# Altium PCB John_Main.PcbDoc (part 2 of 5)
Units mil, origin at the board's own origin, x right, y up, seen from the top; angles counter-clockwise.
Board outline 3346 x 2756 mil, 2 copper layers (Top Layer, Bottom Layer), stack 57 mil thick; 275 components, 161 nets, 721 pads, 398 vias.
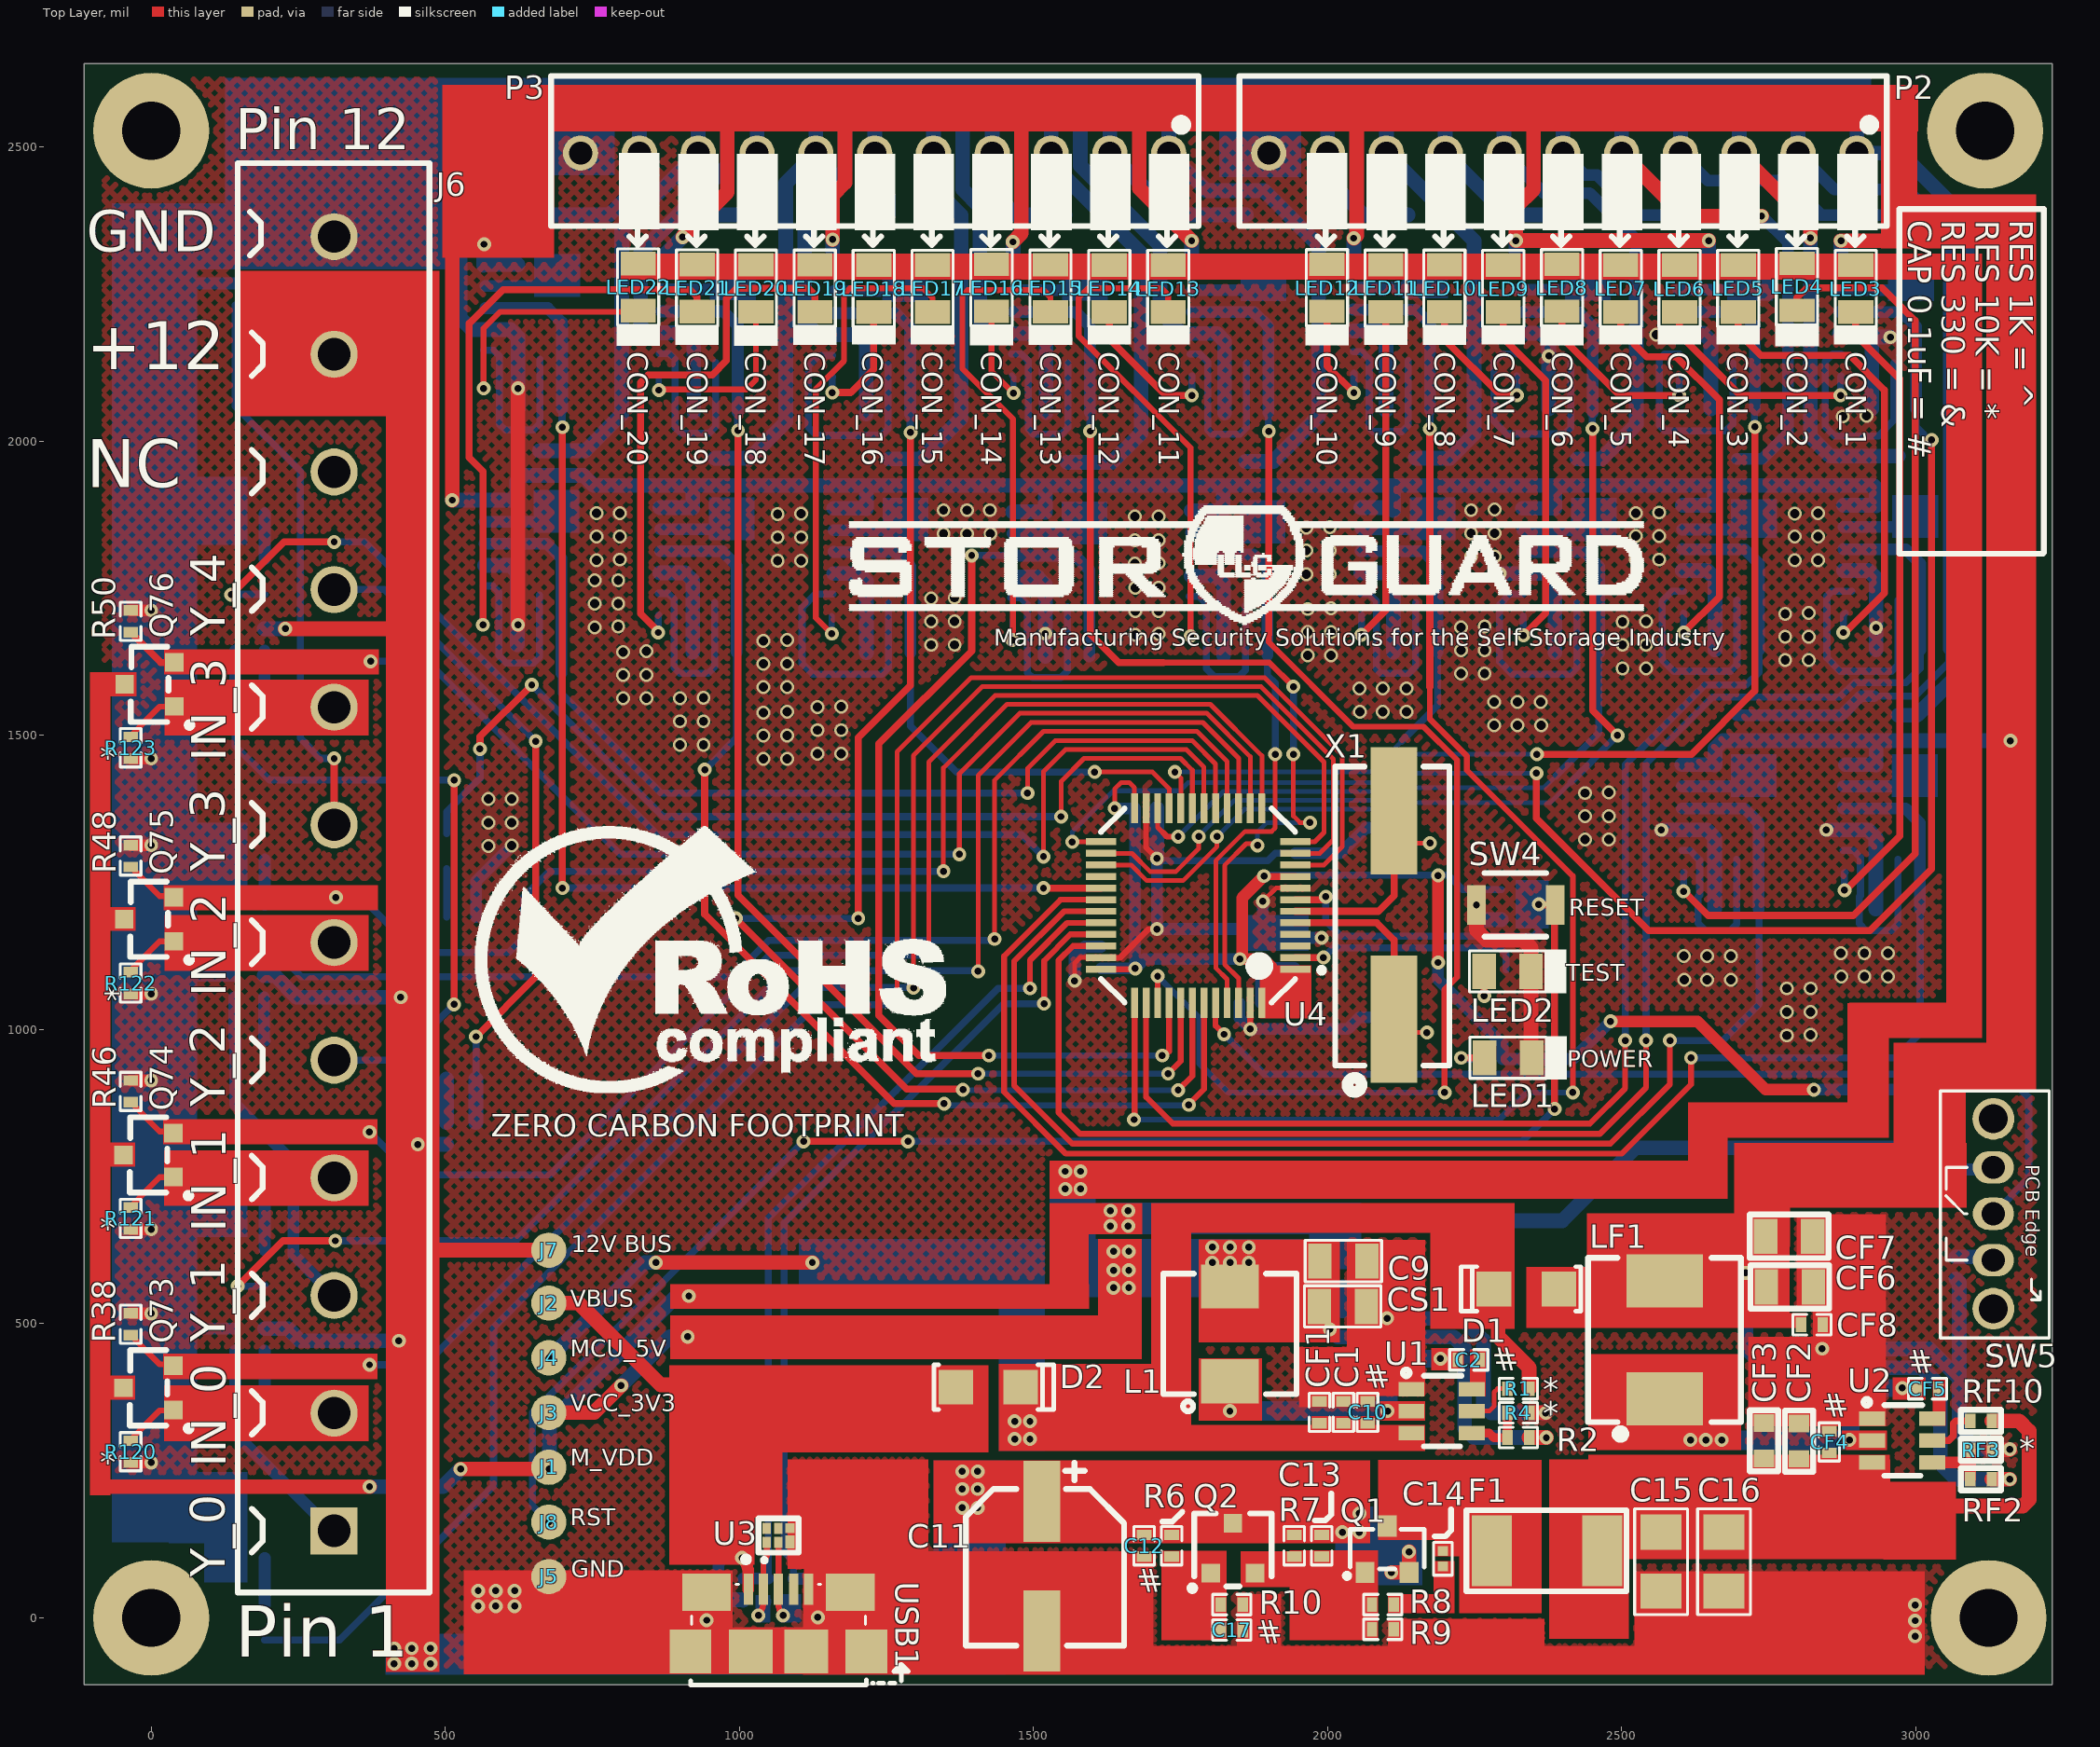
[diagram p0: Top Layer view]

## Part data (continued)
LED1: "LED GREEN CLEAR CHIP 0603 SMD", Case/Package=0603, Case Code (Metric)=1608, Color=Green, Forward Current=30mA, Forward Voltage=2V, Lens Color=Colorless, MANUFACTURER="Vishay Lite-On", Max Operating Temperature=85°C, Min Operating Temperature=-55°C, Package Quantity=1, Power Dissipation=75mW, Reverse Voltage=5V, Supplier Part Number 1=160-1435-6-ND, Test Current=20mA, Case Code (Imperial)=0603, ComponentLink1Description=https://www.verical.com/server-webapp/html/getDatasheet?partID=141494&src-supplier=Verical, ComponentLink1URL=https://www.verical.com/server-webapp/html/getDatasheet?partID=141494&src-supplier=Verical, ComponentLink2Description=http://optoelectronics.liteon.com/upload/download/DS22-2000-074/LTST-C190KGKT.PDF?src-supplier=Digi-Key, ComponentLink2URL=http://optoelectronics.liteon.com/upload/download/DS22-2000-074/LTST-C190KGKT.PDF?src-supplier=Digi-Key, ComponentLink3Description=http://www.mouser.com/ds/2/239/LTST-C190KGKT-1141861.pdf?src-supplier=Mouser, ComponentLink3URL=http://www.mouser.com/ds/2/239/LTST-C190KGKT-1141861.pdf?src-supplier=Mouser, ComponentLink4Description=http://uk.rs-online.com/webdocs/0dc0/0900766b80dc02a8.pdf?src-supplier=RSComponents, ComponentLink4URL=http://uk.rs-online.com/webdocs/0dc0/0900766b80dc02a8.pdf?src-supplier=RSComponents, Depth=0.8mm, Dominant Wavelength=571nm, Height=0.8mm, Illumination Color=Green, Lead Free="Lead Free", Length=1.6mm, Lens Style=Diffused,Colorless,Rectangular,Clear, Lens Transparency=Clear, Luminous Intensity=35mcd, Manufacturer Part Number=LTST-C190KGKT, Mount="Surface Mount", Number of Elements=1, Number of LEDs=1, Number of Pins=2, Packaging="Tape and Reel", Power Rating=75mW, Pricing 1="1=0.26, 10=0.188, 25=0.138, 100=0.0987, 250=0.06712, 500=0.05922, 1000=0.04639 (USD)", Radiation Hardening=No, Stock 1=1327387, Supplier 1=Digi-Key, Viewing Angle=130°, Wavelength=574nm, Width=0.8mm
LED2 LED3 LED4 LED5 LED6 LED7 LED8 LED9 LED10 LED11 LED12 LED13 LED14 LED15 LED16 LED17 LED18 LED19 LED20 LED21 LED22: "LED GREEN CLEAR CHIP SMD", Case/Package=0603, Case Code (Metric)=1608, Color=Green, Forward Current=30mA, Forward Voltage=2V, Lens Color=Colorless, MANUFACTURER="Vishay Lite-On", Max Operating Temperature=85°C, Min Operating Temperature=-55°C, Package Quantity=1, Power Dissipation=75mW, Reverse Voltage=5V, Supplier Part Number 1=160-1435-6-ND, Test Current=20mA, Case Code (Imperial)=0603, ComponentLink1Description=https://www.verical.com/server-webapp/html/getDatasheet?partID=141494&src-supplier=Verical, ComponentLink1URL=https://www.verical.com/server-webapp/html/getDatasheet?partID=141494&src-supplier=Verical, ComponentLink2Description=http://optoelectronics.liteon.com/upload/download/DS22-2000-074/LTST-C190KGKT.PDF?src-supplier=Digi-Key, ComponentLink2URL=http://optoelectronics.liteon.com/upload/download/DS22-2000-074/LTST-C190KGKT.PDF?src-supplier=Digi-Key, ComponentLink3Description=http://www.mouser.com/ds/2/239/LTST-C190KGKT-1141861.pdf?src-supplier=Mouser, ComponentLink3URL=http://www.mouser.com/ds/2/239/LTST-C190KGKT-1141861.pdf?src-supplier=Mouser, ComponentLink4Description=http://uk.rs-online.com/webdocs/0dc0/0900766b80dc02a8.pdf?src-supplier=RSComponents, ComponentLink4URL=http://uk.rs-online.com/webdocs/0dc0/0900766b80dc02a8.pdf?src-supplier=RSComponents, Depth=0.8mm, Dominant Wavelength=571nm, Height=0.8mm, Illumination Color=Green, Lead Free="Lead Free", Length=1.6mm, Lens Style=Diffused,Colorless,Rectangular,Clear, Lens Transparency=Clear, Luminous Intensity=35mcd, Manufacturer Part Number=LTST-C190KGKT, Mount="Surface Mount", Number of Elements=1, Number of LEDs=1, Number of Pins=2, Packaging="Tape and Reel", Power Rating=75mW, Pricing 1="1=0.26, 10=0.188, 25=0.138, 100=0.0987, 250=0.06712, 500=0.05922, 1000=0.04639 (USD)", Radiation Hardening=No, Stock 1=1327387, Supplier 1=Digi-Key, Viewing Angle=130°, Wavelength=574nm, Width=0.8mm
LF1: "FIXED IND 3.3UH 6A 30 MOHM SMD", Case/Package=Nonstandard, Current Rating=6A, DC Resistance (DCR)=30mR, Inductance=3.3uH, Inductance Tolerance=20%, MANUFACTURER="Eaton Cooper", Max DC Current=13.5A, Max Operating Temperature=125°C, Min Operating Temperature=-55°C, Package Quantity=1500, Self Resonant Frequency=5MHz, Supplier Part Number 1=513-1704-6-ND, Test Frequency=100kHz, ComponentLink1Description=http://uk.rs-online.com/webdocs/116a/0900766b8116a344.pdf?src-supplier=RSComponents, ComponentLink1URL=http://uk.rs-online.com/webdocs/116a/0900766b8116a344.pdf?src-supplier=RSComponents, ComponentLink2Description=http://www.cooperbussmann.com/pdf/b1c6e5a7-68ac-495d-bbf3-15e0507f2816.pdf?src-supplier=Future+Electronics, ComponentLink2URL=http://www.cooperbussmann.com/pdf/b1c6e5a7-68ac-495d-bbf3-15e0507f2816.pdf?src-supplier=Future+Electronics, ComponentLink3Description=http://www.farnell.com/datasheets/1508418.pdf?src-supplier=Element14, ComponentLink3URL=http://www.farnell.com/datasheets/1508418.pdf?src-supplier=Element14, ComponentLink4Description=http://www.cooperindustries.com/content/dam/public/bussmann/Electronics/Resources/product-datasheets/Bus_Elx_DS_4085_HCM0703_Series.pdf?src-supplier=Onlinecomponents.com, ComponentLink4URL=http://www.cooperindustries.com/content/dam/public/bussmann/Electronics/Resources/product-datasheets/Bus_Elx_DS_4085_HCM0703_Series.pdf?src-supplier=Onlinecomponents.com, ComponentLink5Description=http://www.cooperbussmann.com/pdf/b1c6e5a7-68ac-495d-bbf3-15e0507f2816.pdf?src-supplier=Element14, ComponentLink5URL=http://www.cooperbussmann.com/pdf/b1c6e5a7-68ac-495d-bbf3-15e0507f2816.pdf?src-supplier=Element14, Composition=Wirewound, Core Material=Ferrite,Composite, DC Current=6A, Depth=7mm, Height=3mm, Height - Seated (Max)=0.118inch, Lead Free="Lead Free", Length=7.4mm, Manufacturer Part Number=HCM0703-3R3-R, Military Standard=Not, Mount="Surface Mount", Number of Pins=2, Packaging="Tape and Reel", Pricing 1="1=2.49, 10=2.298, 100=1.6084, 500=1.30204 (USD)", Radiation Hardening=No, REACH SVHC="No SVHC", RMS Current (Irms)=6A, Saturation Current=13.5A, Shielding=Shielded, Stock 1=3231, Supplier 1=Digi-Key, Termination=SMD/SMT, Tolerance=20%, Weight=0.016oz, Width=0.26inch
P2 P3: "CONN HEADER VERT 11POS 2.54MM", Contact Resistance=10mR, Housing Color=White, MANUFACTURER=Molex, Max Operating Temperature=75°C, Min Operating Temperature=0°C, Supplier Part Number 1=23-0022232111-ND, ComponentLink1Description=http://components.arrow.com/part/dataview/4703620S3674830N3303?src-supplier=Arrow, ComponentLink1URL=http://components.arrow.com/part/dataview/4703620S3674830N3303?src-supplier=Arrow, Contact Material=Brass, Contact Plating=Copper,Tin, Depth=6.35mm, Gender=Male, Housing Material=Nylon, Length=27.94mm, Manufacturer Part Number=0022232111, Number of Contacts=11, Number of Rows=1, Orientation=Straight, Packaging=Bag, Pitch=2.54mm, Pricing 1="1=0.74, 10=0.652, 100=0.5628, 500=0.46046, 1000=0.4093, 5000=0.35813, 10000=0.34023 (USD)", Stock 1=1529, Supplier 1=Digi-Key, Termination=Solder
Q1: "P-Channel 30V Fast Switching MOSFET", MANUFACTURER="TY Semiconductor", Package/Case=SOT23, ComponentLink1Description=https://datasheet.ciiva.com/22641/1596366-22641636.pdf, ComponentLink1URL=https://datasheet.ciiva.com/22641/1596366-22641636.pdf, ComponentLink2Description=https://datasheet.ciiva.com/1190/1596366-1190137.pdf, ComponentLink2URL=https://datasheet.ciiva.com/1190/1596366-1190137.pdf, ComponentLink3Description=https://datasheet.ciiva.com/15198/getdatasheetpartid-110266-15198908.pdf, ComponentLink3URL=https://datasheet.ciiva.com/15198/getdatasheetpartid-110266-15198908.pdf, ComponentLink4Description=https://datasheet.ciiva.com/8115/bss138lt1-d-8115295.pdf, ComponentLink4URL=https://datasheet.ciiva.com/8115/bss138lt1-d-8115295.pdf, ComponentLink5Description=https://datasheet.ciiva.com/8115/bss138lt1-d-8115358.pdf, ComponentLink5URL=https://datasheet.ciiva.com/8115/bss138lt1-d-8115358.pdf, ComponentLink6Description=https://datasheet.ciiva.com/1190/1596366-1190136.pdf, ComponentLink6URL=https://datasheet.ciiva.com/1190/1596366-1190136.pdf, ComponentLink7Description=https://datasheet.ciiva.com/936/bss138lt1-d-936802.pdf, ComponentLink7URL=https://datasheet.ciiva.com/936/bss138lt1-d-936802.pdf, ComponentLink8Description=https://datasheet.ciiva.com/936/bss138lt1-d-936801.pdf, ComponentLink8URL=https://datasheet.ciiva.com/936/bss138lt1-d-936801.pdf, ComponentLink9Description=https://datasheet.ciiva.com/14553/70099493-14553829.pdf, ComponentLink9URL=https://datasheet.ciiva.com/14553/70099493-14553829.pdf, ComponentLink10Description=https://datasheet.ciiva.com/936/bss138lt1-d-936803.pdf, ComponentLink10URL=https://datasheet.ciiva.com/936/bss138lt1-d-936803.pdf, Manufacturer Part No.=QM3001K
Q2: "NPN Resistor-Equiped Transistor", Case/Package=SOT-23-3, Continuous Drain Current (ID)=200mA, Drain to Source Breakdown Voltage=50V, Drain to Source Resistance=3.5R, Gate to Source Voltage (Vgs)=20V, Input Capacitance=50pF, MANUFACTURER="ON Semiconductor", Max Operating Temperature=150°C, Max Power Dissipation=225mW, Min Operating Temperature=-55°C, Package Quantity=1, Supplier Part Number 1=BSS138LT1GOSDKR-ND, Threshold Voltage=1.5V, ComponentLink1Description=https://datasheet.ciiva.com/22641/1596366-22641636.pdf, ComponentLink1URL=https://datasheet.ciiva.com/22641/1596366-22641636.pdf, ComponentLink2Description=https://datasheet.ciiva.com/1190/1596366-1190137.pdf, ComponentLink2URL=https://datasheet.ciiva.com/1190/1596366-1190137.pdf, ComponentLink3Description=https://datasheet.ciiva.com/15198/getdatasheetpartid-110266-15198908.pdf, ComponentLink3URL=https://datasheet.ciiva.com/15198/getdatasheetpartid-110266-15198908.pdf, ComponentLink4Description=https://datasheet.ciiva.com/8115/bss138lt1-d-8115295.pdf, ComponentLink4URL=https://datasheet.ciiva.com/8115/bss138lt1-d-8115295.pdf, ComponentLink5Description=https://datasheet.ciiva.com/8115/bss138lt1-d-8115358.pdf, ComponentLink5URL=https://datasheet.ciiva.com/8115/bss138lt1-d-8115358.pdf, ComponentLink6Description=https://datasheet.ciiva.com/1190/1596366-1190136.pdf, ComponentLink6URL=https://datasheet.ciiva.com/1190/1596366-1190136.pdf, ComponentLink7Description=https://datasheet.ciiva.com/936/bss138lt1-d-936802.pdf, ComponentLink7URL=https://datasheet.ciiva.com/936/bss138lt1-d-936802.pdf, ComponentLink8Description=https://datasheet.ciiva.com/936/bss138lt1-d-936801.pdf, ComponentLink8URL=https://datasheet.ciiva.com/936/bss138lt1-d-936801.pdf, ComponentLink9Description=https://datasheet.ciiva.com/14553/70099493-14553829.pdf, ComponentLink9URL=https://datasheet.ciiva.com/14553/70099493-14553829.pdf, ComponentLink10Description=https://datasheet.ciiva.com/936/bss138lt1-d-936803.pdf, ComponentLink10URL=https://datasheet.ciiva.com/936/bss138lt1-d-936803.pdf, Contact Plating=Tin,Matte, Current Rating=200mA, Element Configuration=Single, Halogen Free="Halogen Free", Height=1.01mm, Lead Free="Lead Free", Length=3.04mm, Manufacturer Part Number=BSS138LT1G, Nominal Vgs=1.5V, Number of Elements=1, Number of Pins=3, On-State Resistance=3.5R, Packaging="Tape and Reel", Power Dissipation=225mW, Pricing 1="1=0.29, 10=0.262, 100=0.1468, 500=0.0786, 1000=0.0535 (USD)", Radiation Hardening=No, Rds On Max=3.5R, REACH SVHC="No SVHC", Stock 1=188395, Supplier 1=Digi-Key, Turn-Off Delay Time=20ns, Turn-On Delay Time=20ns, Voltage Rating (DC)=50V, Width=1.4mm
Q13 Q14 Q15 Q16 Q25 Q26 Q27 Q28 Q37 Q38 Q43 Q44 Q45 Q46 Q55 Q56 Q57 Q58 Q67 Q68: "MOSFET P-CH 20V 2.8A SOT-23", MANUFACTURER=Nexperia, Supplier Part Number 1=1727-3124-1-ND, Manufacturer Part Number=PMV65XP,215, Pricing 1="1=0.38, 10=0.28, 25=0.2452, 100=0.133, 250=0.13232, 500=0.1085, 1000=0.0805 (USD)", Stock 1=60287, Supplier 1=Digi-Key
Q17 Q18 Q19 Q20 Q21 Q22 Q23 Q24 Q29 Q30 Q31 Q32 Q33 Q34 Q35 Q36 Q39 Q40 Q41 Q42 Q47 Q48 Q49 Q50 Q51 Q52 Q53 Q54 Q59 Q60 Q61 Q62 Q63 Q64 Q65 Q66 Q69 Q70 Q71 Q72 Q73 Q74 Q75 Q76: "MOSFET N-CH 50V 200MA SOT-23", Case/Package=SOT-23-3, Continuous Drain Current (ID)=200mA, Drain to Source Breakdown Voltage=50V, Drain to Source Resistance=3.5R, Gate to Source Voltage (Vgs)=20V, Input Capacitance=50pF, MANUFACTURER="ON Semiconductor", Max Operating Temperature=150°C, Max Power Dissipation=225mW, Min Operating Temperature=-55°C, Package Quantity=1, Supplier Part Number 1=BSS138LT1GOSDKR-ND, Threshold Voltage=1.5V, ComponentLink1Description=https://datasheet.ciiva.com/22641/1596366-22641636.pdf, ComponentLink1URL=https://datasheet.ciiva.com/22641/1596366-22641636.pdf, ComponentLink2Description=https://datasheet.ciiva.com/1190/1596366-1190137.pdf, ComponentLink2URL=https://datasheet.ciiva.com/1190/1596366-1190137.pdf, ComponentLink3Description=https://datasheet.ciiva.com/15198/getdatasheetpartid-110266-15198908.pdf, ComponentLink3URL=https://datasheet.ciiva.com/15198/getdatasheetpartid-110266-15198908.pdf, ComponentLink4Description=https://datasheet.ciiva.com/8115/bss138lt1-d-8115295.pdf, ComponentLink4URL=https://datasheet.ciiva.com/8115/bss138lt1-d-8115295.pdf, ComponentLink5Description=https://datasheet.ciiva.com/8115/bss138lt1-d-8115358.pdf, ComponentLink5URL=https://datasheet.ciiva.com/8115/bss138lt1-d-8115358.pdf, ComponentLink6Description=https://datasheet.ciiva.com/1190/1596366-1190136.pdf, ComponentLink6URL=https://datasheet.ciiva.com/1190/1596366-1190136.pdf, ComponentLink7Description=https://datasheet.ciiva.com/936/bss138lt1-d-936802.pdf, ComponentLink7URL=https://datasheet.ciiva.com/936/bss138lt1-d-936802.pdf, ComponentLink8Description=https://datasheet.ciiva.com/936/bss138lt1-d-936801.pdf, ComponentLink8URL=https://datasheet.ciiva.com/936/bss138lt1-d-936801.pdf, ComponentLink9Description=https://datasheet.ciiva.com/14553/70099493-14553829.pdf, ComponentLink9URL=https://datasheet.ciiva.com/14553/70099493-14553829.pdf, ComponentLink10Description=https://datasheet.ciiva.com/936/bss138lt1-d-936803.pdf, ComponentLink10URL=https://datasheet.ciiva.com/936/bss138lt1-d-936803.pdf, ComponentLink11Description=http://www.onsemi.com/pub/Collateral/BSS138LT1-D.PDF?src-supplier=Digi-Key, ComponentLink11URL=http://www.onsemi.com/pub/Collateral/BSS138LT1-D.PDF?src-supplier=Digi-Key, ComponentLink12Description=http://www.farnell.com/datasheets/1596366.pdf?src-supplier=Element14, ComponentLink12URL=http://www.farnell.com/datasheets/1596366.pdf?src-supplier=Element14, ComponentLink13Description=http://www.alliedelec.com/m/d/b3c6fd7d92596813fe75d33dcbaaae90.pdf?src-supplier=Allied+Electronics, ComponentLink13URL=http://www.alliedelec.com/m/d/b3c6fd7d92596813fe75d33dcbaaae90.pdf?src-supplier=Allied+Electronics, ComponentLink14Description=https://www.verical.com/server-webapp/html/getDatasheet?partID=110266&src-supplier=Verical, ComponentLink14URL=https://www.verical.com/server-webapp/html/getDatasheet?partID=110266&src-supplier=Verical, ComponentLink15Description=http://www.onsemi.com/pub_link/Collateral/BSS138LT1-D.PDF?src-supplier=Avnet, ComponentLink15URL=http://www.onsemi.com/pub_link/Collateral/BSS138LT1-D.PDF?src-supplier=Avnet, Contact Plating=Tin,Matte, Current Rating=200mA, Element Configuration=Single, Halogen Free="Halogen Free", Height=1.01mm, Lead Free="Lead Free", Length=3.04mm, Manufacturer Part Number=BSS138LT1G, Nominal Vgs=1.5V, Number of Elements=1, Number of Pins=3, On-State Resistance=3.5R, Packaging="Tape and Reel", Power Dissipation=225mW, Pricing 1="1=0.27, 10=0.222, 100=0.1177, 500=0.07746, 1000=0.05267 (USD)", Radiation Hardening=No, Rds On Max=3.5R, REACH SVHC="No SVHC", Stock 1=1283212, Supplier 1=Digi-Key, Turn-Off Delay Time=20ns, Turn-On Delay Time=20ns, Voltage Rating (DC)=50V, Width=1.4mm
R1 R4 R59 R60 R61 R62 R63 R64 R65 R66 R71 R72 R73 R74 R75 R76 R77 R78 R83 R84 R85 R86 R90 R91 R92 R93 R94 R95 R96 R97 R102 R103 R104 R105 R106 R107 R108 R109 R114 R115 R116 R117 R120 R121 R122 R123: library part RC0402FR-0710KL, "RES SMD 10K OHM 1% 1/16W 0402", Case/Package=0402, MANUFACTURER="Yageo Phycomp", Max Operating Temperature=155°C, Min Operating Temperature=-55°C, Power Rating=63mW, Resistance=10000R, Supplier Part Number 1=311-10.0KLRCT-ND, Temperature Coefficient=100ppm/°C, Tolerance=1%, Voltage Rating (DC)=50V, Depth=0.5mm, Height=0.32mm, Lead Free="Lead Free", Length=1mm, Manufacturer Part Number=RC0402FR-0710KL, Mount="Surface Mount", Number of Pins=2, Packaging="Cut Tape", Pricing 1="1=0.1, 10=0.016, 100=0.0067, 1000=0.00301, 2500=0.00261, 5000=0.00215 (USD)", REACH SVHC="No SVHC", Stock 1=98435877, Supplier 1=Digi-Key, Width=500um
R2: library part RC0402FR-0733K2L, "RES SMD 33.2K OHM 1% 1/16W 0402", Case/Package=0402, Case Code (Metric)=1005, MANUFACTURER=Yageo, Max Operating Temperature=155°C, Min Operating Temperature=-55°C, Power Rating=62.5mW, Resistance=33.2kR, Supplier Part Number 1=311-33.2KLRDKR-ND, Temperature Coefficient=100ppm/°C, Tolerance=1%, Voltage Rating=50V, Case Code (Imperial)=0402, ComponentLink1Description=http://www.yageo.com/documents/recent/PYu-RC0402_51_RoHS_L_6_r.pdf?src-supplier=Future+Electronics, ComponentLink1URL=http://www.yageo.com/documents/recent/PYu-RC0402_51_RoHS_L_6_r.pdf?src-supplier=Future+Electronics, ComponentLink2Description=http://www.mouser.com/ds/2/447/PYu-RC0402_51_RoHS_L_6_r-8721.pdf?src-supplier=Mouser, ComponentLink2URL=http://www.mouser.com/ds/2/447/PYu-RC0402_51_RoHS_L_6_r-8721.pdf?src-supplier=Mouser, Composition="Thick Film", Depth=0.5mm, Lead Free="Lead Free", Length=1mm, Manufacturer Part Number=RC0402FR-0733K2L, Military Standard=Not, Number of Terminations=2, Packaging="Tape and Reel", Pricing 1="1=0.1, 10=0.016, 100=0.0064, 1000=0.00289, 2500=0.00251, 5000=0.00207 (USD)", Stock 1=577926, Supplier 1=Digi-Key, Termination=SMD/SMT, Working Voltage=50V
R3 R58: library part RT0402FRE071KL, "RES SMD 1K OHM 1% 1/16W 0402", Case/Package=0402, Case Code (Metric)=1005, MANUFACTURER=Yageo, Max Operating Temperature=125°C, Max Power Dissipation=63mW, Min Operating Temperature=-55°C, Package Quantity=10000, Power Rating=62.5mW, Resistance=1kR, Supplier Part Number 1=YAG1234CT-ND, Temperature Coefficient=50ppm/°C, Tolerance=1%, Voltage Rating=50V, Case Code (Imperial)=0402, ComponentLink1Description=http://www.mouser.com/ds/2/447/yageodocoutput-1125656.pdf?src-supplier=Mouser, ComponentLink1URL=http://www.mouser.com/ds/2/447/yageodocoutput-1125656.pdf?src-supplier=Mouser, ComponentLink2Description=http://www.yageo.com/documents/recent/PYu-RT_1-to-0.01_RoHS_L_9.pdf?src-supplier=Digi-Key, ComponentLink2URL=http://www.yageo.com/documents/recent/PYu-RT_1-to-0.01_RoHS_L_9.pdf?src-supplier=Digi-Key, Composition="Thin Film", Contact Plating=Tin,Matte,Lead, Depth=0.5mm, Features="Moisture Resistant", Height=0.014inch, Lead Free="Lead Free", Length=1mm, Manufacturer Part Number 1=RT0402FRE071KL, Military Standard=Not, Number of Terminations=2, Packaging="Tape and Reel", Pricing 1="1=0.1, 10=0.072, 100=0.0277, 1000=0.0122, 2500=0.0105, 5000=0.0094 (USD)", Radiation Hardening=No, Stock 1=228425, Supplier 1=Digi-Key, Termination=SMD/SMT, Voltage Rating (DC)=50V, Width=0.02inch
R5 R13 R14 R21 R22: library part RC0603JR-07390RL, "RES SMD 390 OHM 5% 1/10W 0603", Case/Package=0603, Case Code (Metric)=1608, MANUFACTURER=Yageo, Max Operating Temperature=155°C, Max Power Dissipation=100mW, Min Operating Temperature=-55°C, Package Quantity=1, Supplier Part Number 1=311-390GRCT-ND, Temperature Coefficient=100ppm/°C, Tolerance=5%, Voltage Rating=50V, Working Voltage=75V, Case Code (Imperial)=0603, ComponentLink1Description=http://www.yageo.com.tw/exep/pages/download/literatures/PYu-R_INT-thick_7.pdf?src-supplier=Digi-Key, ComponentLink1URL=http://www.yageo.com.tw/exep/pages/download/literatures/PYu-R_INT-thick_7.pdf?src-supplier=Digi-Key, ComponentLink2Description=http://www.yageo.com/documents/recent/PYu-RC_Group_51_RoHS_L_10.pdf?src-supplier=Digi-Key, ComponentLink2URL=http://www.yageo.com/documents/recent/PYu-RC_Group_51_RoHS_L_10.pdf?src-supplier=Digi-Key, ComponentLink3Description=http://www.yageo.com/documents/recent/PYu-RC_Group_51_RoHS_L_9.pdf?src-supplier=Digi-Key, ComponentLink3URL=http://www.yageo.com/documents/recent/PYu-RC_Group_51_RoHS_L_9.pdf?src-supplier=Digi-Key, ComponentLink4Description=http://www.farnell.com/datasheets/443971.pdf?src-supplier=Element14, ComponentLink4URL=http://www.farnell.com/datasheets/443971.pdf?src-supplier=Element14, Composition="Thick Film", Depth=0.8mm, Features="Moisture Resistant", Height=0.022inch, Lead Free="Lead Free", Length=1.6mm, Manufacturer Part Number=RC0603JR-07390RL, Military Standard=Not, Number of Pins=2, Number of Terminations=2, Packaging="Tape and Reel", Power Rating=100mW, Pricing 1="1=0.1, 10=0.02, 100=0.0081, 1000=0.00362, 2500=0.00314 (USD)", REACH SVHC="No SVHC", Resistance=390R, Stock 1=1598874, Supplier 1=Digi-Key, Termination=SMD/SMT, Voltage Rating (DC)=50V, Width=0.8mm
R6: library part RC0402FR-07330KL, "RES SMD 330K OHM 1% 1/16W 0402", Case/Package=0402, Case Code (Metric)=1005, MANUFACTURER=Yageo, Max Operating Temperature=155°C, Max Power Dissipation=63mW, Min Operating Temperature=-55°C, Package Quantity=1, Resistance=330kR, Supplier Part Number 1=311-330KLRDKR-ND, Temperature Coefficient=100ppm/°C, Tolerance=1%, Voltage Rating=50V, Case Code (Imperial)=0402, ComponentLink1Description=http://www.yageo.com/documents/recent/PYu-RC_Group_51_RoHS_L_9.pdf?src-supplier=Digi-Key, ComponentLink1URL=http://www.yageo.com/documents/recent/PYu-RC_Group_51_RoHS_L_9.pdf?src-supplier=Digi-Key, ComponentLink2Description=http://www.yageo.com/documents/recent/PYu-RC_Group_51_RoHS_L_10.pdf?src-supplier=Digi-Key, ComponentLink2URL=http://www.yageo.com/documents/recent/PYu-RC_Group_51_RoHS_L_10.pdf?src-supplier=Digi-Key, ComponentLink3Description=http://www.mouser.com/ds/2/447/PYu-RC0402_51_RoHS_L_6_r-8721.pdf?src-supplier=Mouser, ComponentLink3URL=http://www.mouser.com/ds/2/447/PYu-RC0402_51_RoHS_L_6_r-8721.pdf?src-supplier=Mouser, ComponentLink4Description=http://www.farnell.com/datasheets/1018594.pdf?src-supplier=Element14, ComponentLink4URL=http://www.farnell.com/datasheets/1018594.pdf?src-supplier=Element14, ComponentLink5Description=http://www.yageo.com/documents/recent/PYu-RC0402_51_RoHS_L_6_r.pdf?src-supplier=Future+Electronics, ComponentLink5URL=http://www.yageo.com/documents/recent/PYu-RC0402_51_RoHS_L_6_r.pdf?src-supplier=Future+Electronics, Composition="Thick Film", Depth=0.5mm, Features="Moisture Resistant", Height=0.016inch, Lead Free="Lead Free", Length=1mm, Manufacturer Part Number=RC0402FR-07330KL, Military Standard=Not, Number of Terminations=2, Packaging="Tape and Reel", Power Rating=63mW, Pricing 1="1=0.1, 10=0.016, 100=0.0067, 1000=0.00301, 2500=0.00261, 5000=0.00215 (USD)", REACH SVHC=Unknown, Stock 1=1006341, Supplier 1=Digi-Key, Termination=SMD/SMT, Width=0.02inch
R7 R9: library part RC0402FR-07220KL, "RES SMD 220K OHM 1% 1/16W 0402", Case/Package=0402, Case Code (Metric)=1005, MANUFACTURER=Yageo, Max Operating Temperature=155°C, Max Power Dissipation=63mW, Min Operating Temperature=-55°C, Package Quantity=1, Power Rating=62.5mW, Resistance=220kR, Supplier Part Number 1=603-RC0402FR-07220KL, Temperature Coefficient=100ppm/°C, Tolerance=1%, Voltage Rating=50V, Case Code (Imperial)=0402, ComponentLink1Description=http://www.yageo.com/NewPortal/yageodocoutput?fileName=/pdf/R-Chip/PYu-RT_1-to-0.05_RoHS_L_5.pdf&src-supplier=Digi-Key, ComponentLink1URL=http://www.yageo.com/NewPortal/yageodocoutput?fileName=/pdf/R-Chip/PYu-RT_1-to-0.05_RoHS_L_5.pdf&src-supplier=Digi-Key, ComponentLink2Description=http://www.mouser.com/ds/2/447/yageodocoutput-1125656.pdf?src-supplier=Mouser, ComponentLink2URL=http://www.mouser.com/ds/2/447/yageodocoutput-1125656.pdf?src-supplier=Mouser, ComponentLink3Description=http://www.farnell.com/datasheets/2167052.pdf?src-supplier=Farnell, ComponentLink3URL=http://www.farnell.com/datasheets/2167052.pdf?src-supplier=Farnell, ComponentLink4Description=http://www.mouser.com/ds/2/447/PYu-RC0402_51_RoHS_L_6_r-8721.pdf?src-supplier=Mouser, ComponentLink4URL=http://www.mouser.com/ds/2/447/PYu-RC0402_51_RoHS_L_6_r-8721.pdf?src-supplier=Mouser, ComponentLink5Description=http://documents.rs-components.com/techlib://itc_doclist_GB.htm?stockno=6186318&src-supplier=RSComponents, ComponentLink5URL=http://documents.rs-components.com/techlib://itc_doclist_GB.htm?stockno=6186318&src-supplier=RSComponents, ComponentLink6Description=http://www.yageo.com/documents/recent/PYu-RC_Group_51_RoHS_L_10.pdf?src-supplier=Digi-Key, ComponentLink6URL=http://www.yageo.com/documents/recent/PYu-RC_Group_51_RoHS_L_10.pdf?src-supplier=Digi-Key, Composition="Thick Film", Depth=0.5mm, Features="Moisture Resistant", Height=0.016inch, Lead Free="Lead Free", Length=1mm, Manufacturer Part Number=RC0402FR-07220KL, Military Standard=Not, Number of Terminations=2, Packaging="Tape and Reel", Pricing 1="1=0.1, 10=0.012, 50=0.012, 100=0.004, 1000=0.003, 10000=0.003 (USD)", REACH SVHC="No SVHC", Stock 1=382153, Supplier 1=Mouser, Termination=SMD/SMT, Weight=2.3E-05oz, Width=0.5mm
R8: library part RC0402FR-07100RL, "RES SMD 100 OHM 1% 1/16W 0402", Case/Package=0402, Case Code (Metric)=1005, MANUFACTURER=Yageo, Max Operating Temperature=155°C, Min Operating Temperature=-55°C, Power Rating=62.5mW, Supplier Part Number 1=311-100LRDKR-ND, Temperature Coefficient=100ppm/°C, Tolerance=1%, Voltage Rating=50V, Case Code (Imperial)=0402, ComponentLink1Description=http://www.farnell.com/datasheets/1784430.pdf?src-supplier=Element14, ComponentLink1URL=http://www.farnell.com/datasheets/1784430.pdf?src-supplier=Element14, ComponentLink2Description=http://www.yageo.com/documents/recent/PYu-RC_Group_51_RoHS_L_9.pdf?src-supplier=Mouser, ComponentLink2URL=http://www.yageo.com/documents/recent/PYu-RC_Group_51_RoHS_L_9.pdf?src-supplier=Mouser, ComponentLink3Description=http://www.yageo.com/documents/recent/PYu-RC0402_51_RoHS_L_6_r.pdf?src-supplier=Future+Electronics, ComponentLink3URL=http://www.yageo.com/documents/recent/PYu-RC0402_51_RoHS_L_6_r.pdf?src-supplier=Future+Electronics, ComponentLink4Description=https://www.verical.com/server-webapp/html/getDatasheet?partID=329466&src-supplier=Verical, ComponentLink4URL=https://www.verical.com/server-webapp/html/getDatasheet?partID=329466&src-supplier=Verical, ComponentLink5Description=http://www.farnell.com/datasheets/1018594.pdf?src-supplier=Element14, ComponentLink5URL=http://www.farnell.com/datasheets/1018594.pdf?src-supplier=Element14, ComponentLink6Description=http://www.farnell.com/datasheets/2167052.pdf?src-supplier=Element14, ComponentLink6URL=http://www.farnell.com/datasheets/2167052.pdf?src-supplier=Element14, ComponentLink7Description=http://documents.rs-components.com/techlib://itc_doclist_GB.htm?stockno=6185810&src-supplier=RSComponents, ComponentLink7URL=http://documents.rs-components.com/techlib://itc_doclist_GB.htm?stockno=6185810&src-supplier=RSComponents, Composition="Thick Film", Depth=0.5mm, Height=0.32mm, Lead Free="Lead Free", Length=1mm, Manufacturer Part Number=RC0402FR-07100RL, Military Standard=Not, Number of Pins=2, Packaging="Tape and Reel", Pricing 1="1=0.1, 10=0.016, 100=0.0067, 1000=0.003, 2500=0.0026, 5000=0.0022 (USD)", REACH SVHC="No SVHC", Resistance=100R, Stock 1=48337393, Supplier 1=Digi-Key, Termination=SMD/SMT, Voltage Rating (DC)=50V, Width=0.5mm
R10: library part RC0402FR-07270KL, "RES SMD 270K OHM 1% 1/16W 0402", Case/Package=0402, Case Code (Metric)=1005, MANUFACTURER=Yageo, Max Operating Temperature=155°C, Max Power Dissipation=63mW, Min Operating Temperature=-55°C, Package Quantity=1, Resistance=270kR, Supplier Part Number 1=311-270KLRCT-ND, Temperature Coefficient=100ppm/°C, Tolerance=1%, Voltage Rating=50V, Case Code (Imperial)=0402, ComponentLink1Description=https://www.verical.com/server-webapp/html/getDatasheet?partID=327811&src-supplier=Verical, ComponentLink1URL=https://www.verical.com/server-webapp/html/getDatasheet?partID=327811&src-supplier=Verical, ComponentLink2Description=http://www.yageo.com/documents/recent/PYu-RC0402_51_RoHS_L_6_r.pdf?src-supplier=Future+Electronics, ComponentLink2URL=http://www.yageo.com/documents/recent/PYu-RC0402_51_RoHS_L_6_r.pdf?src-supplier=Future+Electronics, ComponentLink3Description=http://www.yageo.com/documents/recent/PYu-RC_Group_51_RoHS_L_9.pdf?src-supplier=Digi-Key, ComponentLink3URL=http://www.yageo.com/documents/recent/PYu-RC_Group_51_RoHS_L_9.pdf?src-supplier=Digi-Key, ComponentLink4Description=http://www.yageo.com/documents/recent/PYu-RC_Group_51_RoHS_L_10.pdf?src-supplier=Digi-Key, ComponentLink4URL=http://www.yageo.com/documents/recent/PYu-RC_Group_51_RoHS_L_10.pdf?src-supplier=Digi-Key, Composition="Thick Film", Depth=0.5mm, Features="Moisture Resistant", Height=0.016inch, Lead Free="Lead Free", Length=1mm, Manufacturer Part Number=RC0402FR-07270KL, Military Standard=Not, Number of Terminations=2, Packaging="Tape and Reel", Power Rating=63mW, Pricing 1="1=0.1, 10=0.016, 100=0.0067, 1000=0.003, 2500=0.0026, 5000=0.0022 (USD)", REACH SVHC=Unknown, Stock 1=463404, Supplier 1=Digi-Key, Termination=SMD/SMT, Weight=2.3E-05oz, Width=0.5mm
R11 R15 R18 R23 R24: library part CRCW0402240RFKEDC, "RES 240 OHM 1% 1/16W 0402", Case/Package=SMD/SMT, MANUFACTURER=Vishay, Max Operating Temperature=155°C, Min Operating Temperature=-55°C, Power Rating=62.5mW, Resistor Type="Thick Film", Supplier Part Number 1=541-3997-6-ND, Temperature Coefficient=100ppm/°C, Tolerance=1%, Contact Plating=Tin, Lead Free="Lead Free", Length=1mm, Manufacturer Part Number=CRCW0402240RFKEDC, Mount="Surface Mount", Pricing 1="1=0.1, 10=0.029, 100=0.0118, 1000=0.0053, 2500=0.0046, 5000=0.0038 (USD)", Resistance=240R, Stock 1=85727, Supplier 1=Digi-Key, Termination=Wraparound
R12 R19 R20 R25 R26 RF3: library part RK73B1ETTP103J, "RES 10K OHM 5% 1/10W 0402", Case/Package=0402, Case Code (Metric)=1005, MANUFACTURER="KOA Speer", Max Operating Temperature=155°C, Min Operating Temperature=-55°C, Package Quantity=10000, Power Rating=63mW, Resistance=10kR, Supplier Part Number 1=2019-RK73B1ETTP103JCT-ND, Temperature Coefficient=200ppm/°C, Tolerance=5%, Voltage Rating=50V, Case Code (Imperial)=0402, ComponentLink1Description=https://www.verical.com/server-webapp/html/getDatasheet?partID=89073&src-supplier=Verical, ComponentLink1URL=https://www.verical.com/server-webapp/html/getDatasheet?partID=89073&src-supplier=Verical, Composition="Thick Film", Depth=0.5mm, Height=0.35mm, Lead Free="Lead Free", Length=1mm, Manufacturer Part Number=RK73B1ETTP103J, Military Standard=Not, Mount="Surface Mount", Packaging="Tape and Reel", Pricing 1="1=0.1, 10=0.016, 100=0.0065, 1000=0.00292, 2500=0.00253, 5000=0.00209 (USD)", Stock 1=2917894, Supplier 1=Digi-Key, Termination=SMD/SMT, Voltage Rating (DC)=50V, Width=0.5mm
R16 R17: library part RT0402FRE0727RL, "RES SMD 27 OHM 1% 1/16W 0402", Case/Package=0402, Case Code (Metric)=1005, MANUFACTURER=Yageo, Max Operating Temperature=125°C, Max Power Dissipation=63mW, Min Operating Temperature=-55°C, Package Quantity=10000, Power Rating=62.5mW, Supplier Part Number 1=YAG3343CT-ND, Temperature Coefficient=50ppm/°C, Tolerance=1%, Voltage Rating=50V, Case Code (Imperial)=0402, ComponentLink1Description=http://www.yageo.com/NewPortal/yageodocoutput?fileName=/pdf/R-Chip/PYu-RT_1-to-0.05_RoHS_L_5.pdf&src-supplier=Digi-Key, ComponentLink1URL=http://www.yageo.com/NewPortal/yageodocoutput?fileName=/pdf/R-Chip/PYu-RT_1-to-0.05_RoHS_L_5.pdf&src-supplier=Digi-Key, ComponentLink2Description=http://www.mouser.com/ds/2/447/yageodocoutput-1125656.pdf?src-supplier=Mouser, ComponentLink2URL=http://www.mouser.com/ds/2/447/yageodocoutput-1125656.pdf?src-supplier=Mouser, Composition="Thin Film", Depth=0.5mm, Features="Moisture Resistant", Height=0.014inch, Lead Free="Lead Free", Length=1mm, Manufacturer Part Number 1=RT0402FRE0727RL, Military Standard=Not, Number of Terminations=2, Packaging="Tape and Reel", Pricing 1="1=0.1, 10=0.072, 100=0.0277, 1000=0.0122, 2500=0.0105, 5000=0.0094 (USD)", Resistance=27R, Stock 1=26946, Supplier 1=Digi-Key, Termination=SMD/SMT, Voltage Rating (DC)=50V, Width=0.02inch
R38 R46 R48 R50: library part RC0402FR-074K7L, "RES SMD 4.7K OHM 1% 1/16W 0402", Case/Package=0402, Case Code (Metric)=1005, MANUFACTURER=Yageo, Max Operating Temperature=155°C, Min Operating Temperature=-55°C, Power Rating=62.5mW, Resistance=4.7kR, Supplier Part Number 1=311-4.7KLRCT-ND, Temperature Coefficient=100ppm/°C, Tolerance=1%, Voltage Rating=50V, Case Code (Imperial)=0402, ComponentLink1Description=http://www.farnell.com/datasheets/1018594.pdf?src-supplier=Element14, ComponentLink1URL=http://www.farnell.com/datasheets/1018594.pdf?src-supplier=Element14, ComponentLink2Description=https://www.verical.com/server-webapp/html/getDatasheet?partID=328119&src-supplier=Verical, ComponentLink2URL=https://www.verical.com/server-webapp/html/getDatasheet?partID=328119&src-supplier=Verical, ComponentLink3Description=http://www.farnell.com/datasheets/1686128.pdf?src-supplier=Element14, ComponentLink3URL=http://www.farnell.com/datasheets/1686128.pdf?src-supplier=Element14, Composition="Thick Film", Depth=0.5mm, Height=0.32mm, Lead Free="Lead Free", Length=1mm, Manufacturer Part Number 1=RC0402FR-074K7L, Military Standard=Not, Number of Pins=2, Packaging="Tape and Reel", Pricing 1="1=0.1, 10=0.016, 100=0.0067, 1000=0.003, 2500=0.0026, 5000=0.0022 (USD)", REACH SVHC="No SVHC", Stock 1=26143098, Supplier 1=Digi-Key, Termination=SMD/SMT, Voltage Rating (DC)=50V, Width=0.5mm